# Altium PCB SBH_Charger.PcbDoc (part 2 of 3)
Units mil, origin at the board's own origin, x right, y up, seen from the top; angles counter-clockwise.
Board outline 4700 x 3200 mil, 4 copper layers (Top Layer, Mid Layer 1, Mid Layer 2, Bottom Layer), stack 61.811 mil thick; 160 components, 116 nets, 654 pads, 375 vias.
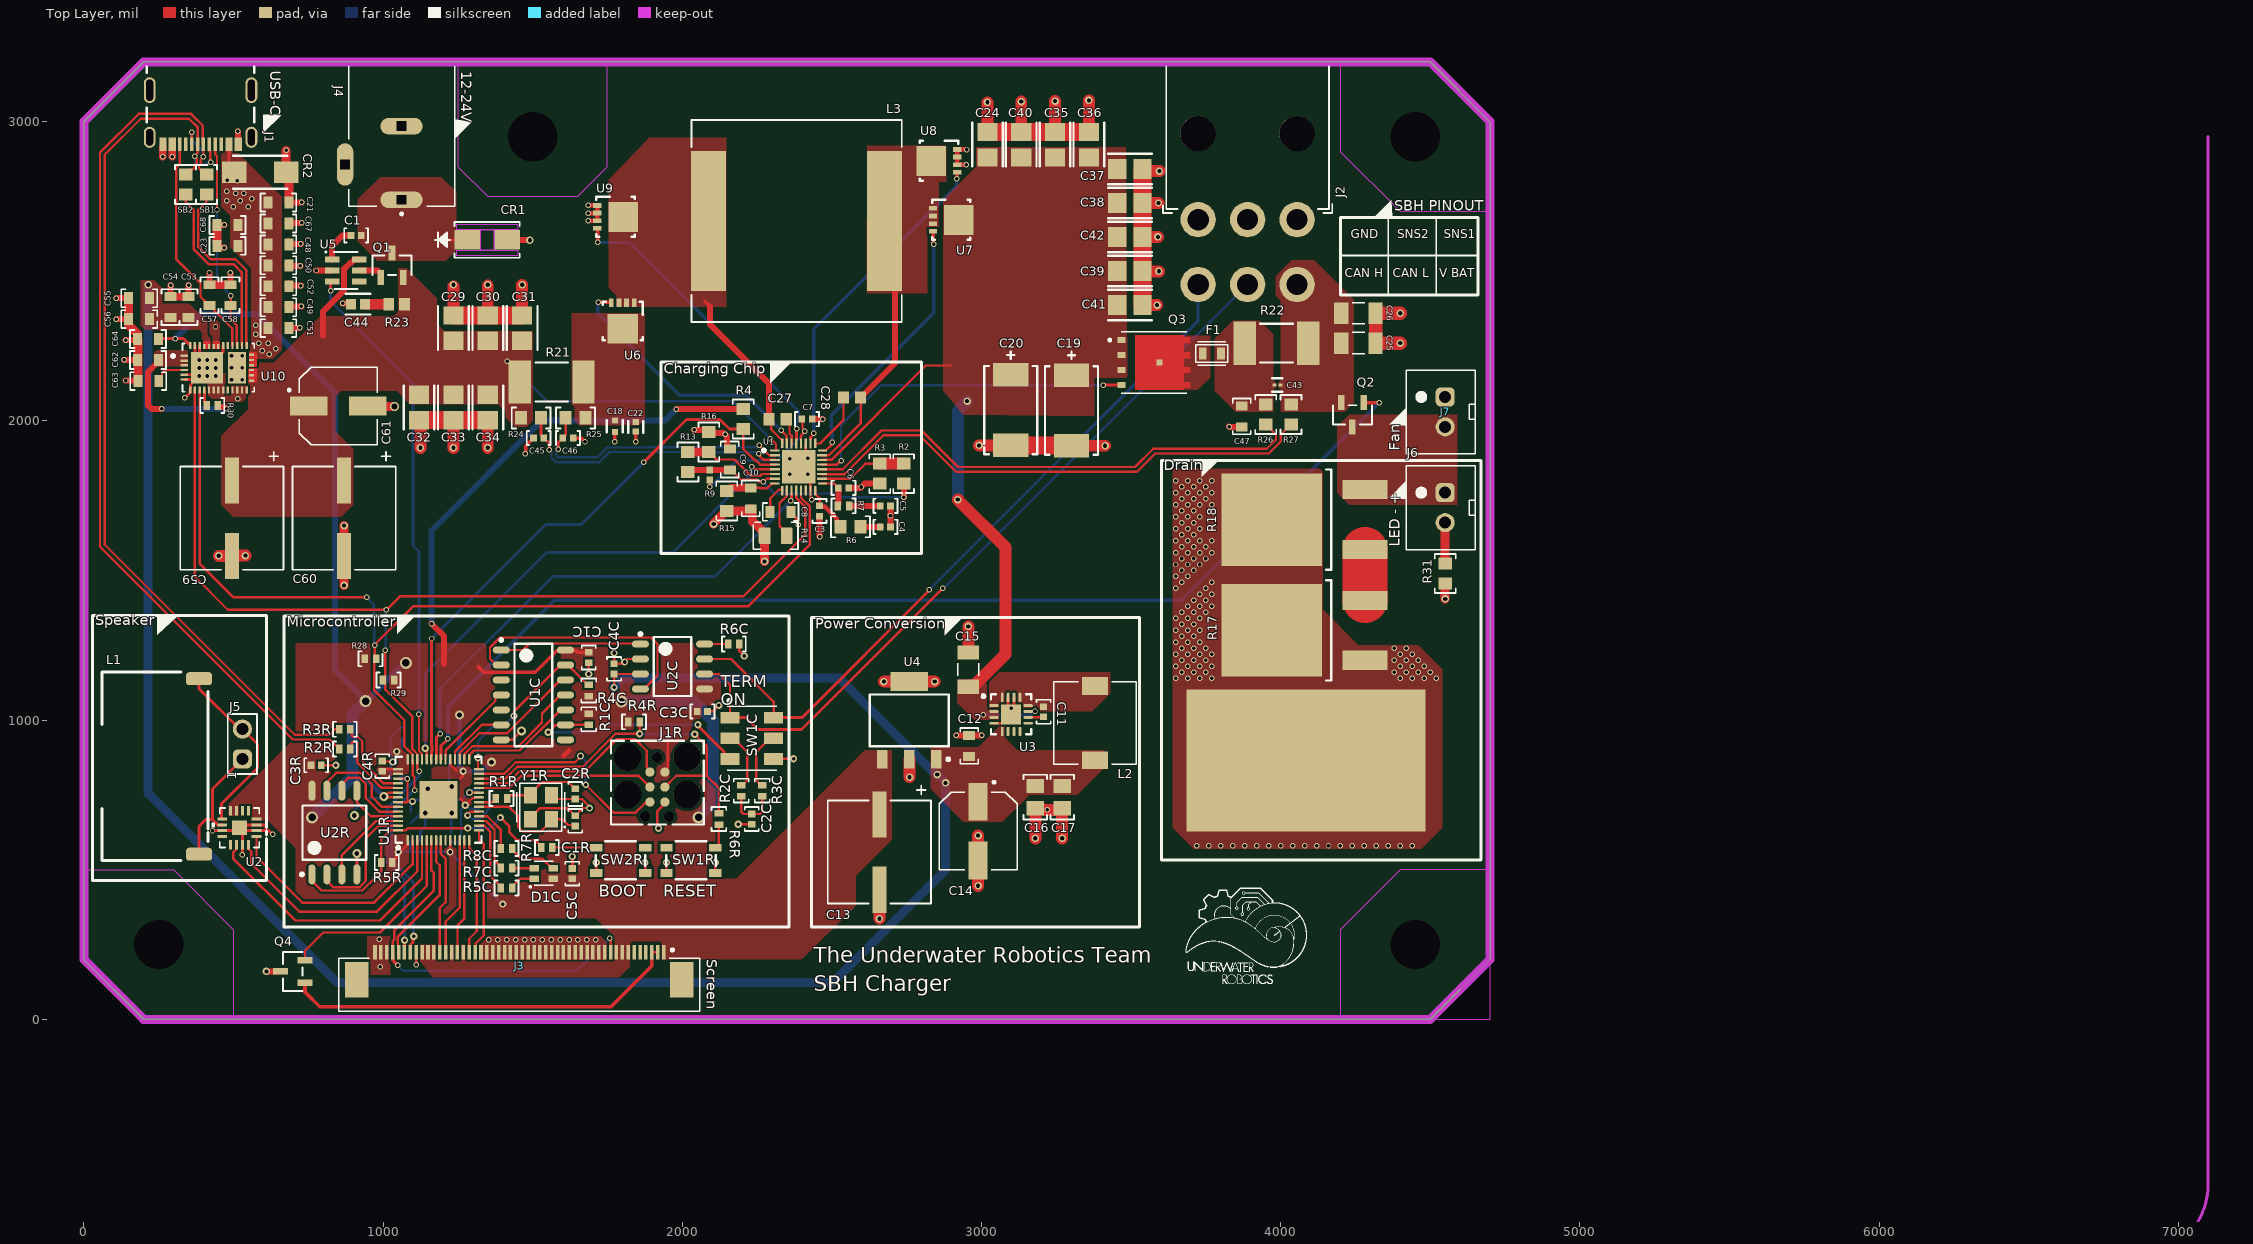
[diagram p0: Top Layer view]

## Part data (continued)
R3: library part RESISTOR_100K_0603, "RES 100k OHM 5% 1/10W 0603", Digikey Part Numer=CR0603-JW-104ELFTR-ND, Supplier Part Number 1=CR0603-JW-104ELFCT-ND, Tolerance="+/- 5%", Value  (Ohms)=100K, ComponentLink1Description=Datasheet, ComponentLink1URL=https://www.bourns.com/docs/product-datasheets/CRxxxxx.pdf, Made By="Flip B", Supplier=Digikey, Supplier 1=Digi-Key, Wattage=1/10W
R4: library part RESISTOR_10K_0603, "RES 10k OHM 5% 1/10W 0603", Digikey Part Numer=CR0603-JW-104ELFTR-ND, Supplier Part Number 1=2019-RK73B1JTTD103JCT-ND, Tolerance="+/- 5%", Value  (Ohms)=10K, ComponentLink1Description=Datasheet, ComponentLink1URL=https://www.bourns.com/docs/product-datasheets/CRxxxxx.pdf, Made By="Robert Pafford", Supplier=Digikey, Supplier 1=Digi-Key, Wattage=1/8W
R5C: library part RESISTOR_604_0402, "RES 604 OHM 1% 1/16W 0402", Digikey Part Numer=CR0603-JW-104ELFTR-ND, Supplier Part Number 1=13-AC0402FR-07604RLCT-ND, Tolerance="+/- 1%", Value  (Ohms)=604, Made By="Robert Pafford", Supplier=Digikey, Supplier 1=Digi-Key, Wattage=1/16W
R6: library part RESISTOR_15K_0603, "RES 15k OHM 5% 1/10W 0603", Digikey Part Numer=CR0603-JW-104ELFTR-ND, Supplier Part Number 1=RMCF0603JG15K0, Tolerance="+/- 5%", Value  (Ohms)=15K, ComponentLink1Description=Datasheet, ComponentLink1URL=https://www.bourns.com/docs/product-datasheets/CRxxxxx.pdf, Made By="Dylan Trainor", Supplier=Digikey, Supplier 1=Avnet, Wattage=1/8W
R7: library part RESISTOR_16.9K_0402, "16.9 kOhms ±1% 0.063W, 1/16W Chip Resistor 0402 (1005 Metric) Moisture Resistant Thick Film", Supplier Part Number 1=5791231, Tolerance="+/- 1%", Value  (Ohms)=16.9k, Made By="Andrew Lin", Supplier 1="Future Electronics", Wattage=1/16W
R7C R8C: library part RESISTOR_200_0402, "RES 200 OHM 1% 1/16W 0402", Digikey Part Numer=CR0603-JW-104ELFTR-ND, Supplier Part Number 1=YAG3453CT-ND, Tolerance="+/- 1%", Value  (Ohms)=200, Made By="Robert Pafford", Supplier=Digikey, Supplier 1=Digi-Key, Wattage=1/16W
R9: library part CMP-2002-03046-1, Manufacturer="Vishay Dale", Part Number=CRCW040210R0FKEDHP
R13: library part RESISTOR_470K_0603, "RES 470k OHM 5% 1/10W 0603", Supplier Part Number 1=RMCF0603JT470KCT-ND, Tolerance="+/- 5%", Value  (Ohms)=470K, ComponentLink1Description=Datasheet, ComponentLink1URL=https://www.bourns.com/docs/product-datasheets/CRxxxxx.pdf, Made By="Robert P", Supplier 1=Digi-Key, Wattage=1/10W
R14: library part RESISTOR_33K_0805, "RES 33k OHM 5% 1/8W 0805", Digikey Part Numer=CR0603-JW-104ELFTR-ND, Supplier Part Number 1=65T8819, Tolerance="+/- 5%", Value  (Ohms)=33K, ComponentLink1Description=Datasheet, ComponentLink1URL=https://www.bourns.com/docs/product-datasheets/CRxxxxx.pdf, Made By="Dylan Trainor", Supplier=Digikey, Supplier 1=Newark, Wattage=1/8W
R15: library part RESISTOR_169K_1%_0603, "169 kOhms ±1% 0.333W, 1/3W Chip Resistor 0603 (1608 Metric) Automotive AEC-Q200, Pulse Withstanding Thick Film", Digikey Part Numer=CR0603-JW-104ELFTR-ND, Supplier Part Number 1=CRCW0603169KFKEAHP-ND, Tolerance="+/- 1%", Value  (Ohms)=169K, ComponentLink1Description=Datasheet, ComponentLink1URL=https://www.bourns.com/docs/product-datasheets/CRxxxxx.pdf, Made By="Andrew Lin", Supplier=Digikey, Supplier 1=Digi-Key, Wattage=1/10W
R16: library part RESISTOR_270K_1%_0603, "RES 270k OHM 1% 1/10W 0603", Digikey Part Numer=CR0603-JW-104ELFTR-ND, Supplier Part Number 1=71-CRCW0603-270K-E3, Tolerance="+/- 1%", Value  (Ohms)=270K, ComponentLink1Description=Datasheet, ComponentLink1URL=https://www.bourns.com/docs/product-datasheets/CRxxxxx.pdf, Made By="Andrew Lin", Supplier=Digikey, Supplier 1=Mouser, Wattage=1/10W
R17 R18: "RES SMD 10 OHM 5% 25W DPAK", Mfr_Name="Bourns Electronics", Supplier Part Number 1=118-PWR163S-25-10R0JECT-ND, Copyright="Copyright (C) 2023 Ultra Librarian. All rights reserved.", Manufacturer_Part_Number=PWR163S-25-10R0JE, Supplier 1=Digi-Key
R21 R22: library part CMP-33361-000001-1, "2W 0.010 OHMS 0.5% 2512", Manufacturer=Ohmite, Package=PCS2512, Power Rating=2W, Resistance=10mΩ, Temperature="-55°C to +170°C", Temperature Coefficient=50ppm/°C, Temperature Range High=+170°C, Temperature Range Low=-55°C, Tolerance=0.%, Automotive=Yes, Automotive Grade="Grade 0", Category=Res, ComponentLink2Description=Datasheet, ComponentLink2URL=https://www.ohmite.com/assets/docs/res_pcs.pdf?r=false, Composition="Metal Film", Device Class L1="Passive Components", Device Class L2=Resistors, Device Class L3="Chip SMD Resistors", Digikey Description="2W 0.010 OHMS 0.5% 2512", Height=0.664mm, Ipc Land Pattern Name=RESC635305X41, Lead Free=Yes, Manufacturer Part Number=PCS2512DR0100ET, Octopart=https://octopart.com/pcs2512dr0100et-ohmite-106082038, RoHS=TRUE, Series=PCS
R23: library part CMP-2000-03206-1, Manufacturer="Vishay Dale", Part Number=CRCW06032R20FKEA
R24 R25: library part RESISTOR_4.7_0603, "RES 4.7 OHM 5% 1/8W 0603", Digikey Part Numer=CR0603-JW-104ELFTR-ND, Supplier Part Number 1=2019-RK73B1JTTD4R7JCT-ND, Tolerance="+/- 5%", Value  (Ohms)=4.7, Made By="Robert Pafford", Supplier=Digikey, Supplier 1=Digi-Key, Wattage=1/8W
R26 R27: library part RESISTOR_27_0603, "RES 27 OHM 5% 1/8W 0603", Digikey Part Numer=CR0603-JW-104ELFTR-ND, Supplier Part Number 1=2019-RK73B1JTTD270JCT-ND, Tolerance="+/- 5%", Value  (Ohms)=27, ComponentLink1Description=Datasheet, ComponentLink1URL=https://www.bourns.com/docs/product-datasheets/CRxxxxx.pdf, Made By="Robert Pafford", Supplier=Digikey, Supplier 1=Digi-Key, Wattage=1/8W
R28 R29: library part RESISTOR_2.2K_0402_1, "RES 2.2K OHM 1% 1/16W 0402", Supplier Part Number 1=9737263, Tolerance="+/- 1%", Value  (Ohms)=2.2K, Made By="Megan McCabe", Supplier 1="Future Electronics", Wattage=1/16W
R31: library part RESISTOR_2.1K_0603, "RES 2.1k OHM 5% 1/8W 0603", Digikey Part Numer=CR0603-JW-104ELFTR-ND, Supplier Part Number 1=YAG1852CT-ND, Tolerance="+/- 5%", Value  (Ohms)=2.1K, ComponentLink1Description=Datasheet, ComponentLink1URL=https://www.bourns.com/docs/product-datasheets/CRxxxxx.pdf, Made By="Robert Pafford", Supplier=Digikey, Supplier 1=Digi-Key, Wattage=1/8W
SB1 SB2: library part JUMPER_0_0603, "0 Ohm Jumper No Fit for Solder Bridge", Value  (Ohms)=0, ComponentLink1Description=Digikey, ComponentLink1URL=https://www.digikey.com/en/products/detail/koa-speer-electronics-inc/RK73B1JTTD101J/9844701, Made By="Robert Pafford"
SW1C: library part CAS-220TA_CAN_TERM, "GOLD SWITCH FLUSH SLIDE DPDT 100MA 6V", Current Rating="100 mA", Supplier Part Number 1=CAS220JCT-ND, Voltage Rating=6VDC, Contact Finish=Gold, Made By="Robert Pafford", Supplier 1=Digi-Key, Switch Function=DPDT
SW1R SW2R: library part "Tactile Switch SMD", "WS-TASV J-Bend SMT Tact Switch, SPST-NO, 16VDC, 50mA, 260g", Manufacturer="Wurth Elektronik", Operating Temperature Max=85°C, Operating Temperature Min=-40°C, Rated Current=50mA, Rated Voltage=16VDC, Category="Tact Switches", Circuit=SPST-NO, ComponentLink1Description="Website Link", ComponentLink1URL=https://www.we-online.com/redexpert/article/434123025826?ad, ComponentLink2Description="Datasheet Link", ComponentLink2URL=https://www.we-online.com/redexpert/spec/434123025826?ad, Contact Material="Stainless Steel", Contact Plating=Silver, Height=2.5mm, Length=4.2mm, Manufacturer Part Number=434123025826, Match Code=WS-TASV, Mount="Surface Mount", Operation Force=260g, Packaging="Tape and Reel", Terminal Material="Copper Alloy", Terminal Plating=Silver, Washable=No, Width=3.2mm
U1: "I2C 1 TO 5 CELL, 2-V, NARROW VDC, Charger IC Multi-Chemistry 32-QFN (4x4)", Mfr_Name="Texas Instruments", Supplier Part Number 1=595-BQ25730RSNR, Copyright="Copyright (C) 2024 Ultra Librarian. All rights reserved.", Manufacturer_Part_Number=BQ25730RSNR, RefDes=RefDes, Supplier 1=Mouser, Type=DEV
U1C: "CANbus Controller CAN 2.0 SPI Interface 14-SOIC", Made By="Robert Pafford", Max FD Rate="8 Mbps"
U1R: "Raspberry Pi RP2040", Crystal Frequency="12 MHz", Input Voltage=3.3V, Available Busses="SPI, I2C, PWM, USB", ComponentLink1Description=DigiKey, ComponentLink2Description=Datasheet, ComponentLink2URL=https://datasheets.raspberrypi.org/rp2040/rp2040-datasheet.pdf, Made By="Robert Pafford", Number of GPIOs=29
U2: "Audio Amplifiers Digital Input Class D Amplifier", Mfr_Name="Analog Devices Inc", Made By="Andrew Lin", RefDes=RefDes, Supplier 1="Arrow Electronics", Supplier Part Number 1=MAX98357AETE+T
U2C: library part TJA1442AT, "CAN Interface IC High-Speed CAN Transceiver with Standby Mode", Supplier Part Number 1=771-TJA1442AT/0Z, Made By="Robert Pafford", Max Data Rate=5Mbps, Supplier 1=Mouser
U2R: "IC FLASH 128MBIT SPI/QUAD 8SOIC", Supplier Part Number 1=W25Q128JVSIQ-ND, Made By="Robert Pafford", Size=128M, Supplier 1=Digi-Key
U3: library part TS30041-M050QFNR, "Buck Switching Regulator IC Positive Fixed 5V 1 Output 1A 16-VFQFN Exposed Pad", Max Current=1A, Max Input Voltage=40V, Output Voltage="5V (Fixed)", Supplier Part Number 1=TS30041-M050QFNRCT-ND, Made By="Robert Pafford", Supplier 1=Digi-Key
U4: library part CMP-1109-00085-1, "Low Drop Linear Voltage Regulator, 4.7 to 40 V Supply, 3.3 V Output, -40 to 150 degC, PG-SOT223 (SC-73), Reel, Green", Dropout Voltage="250 mV", Manufacturer=Infineon, Max. Output Current="400 mA", Operating Range="4.7 to 40 V", Output Voltage="3.3 V", Typical Quiescent Current="100 uA", Accuracy="2 %", ComponentLink1Description="Manufacturer URL", ComponentLink1URL=http://www.infineon.com/, ComponentLink2Description=Datasheet, ComponentLink2URL=http://www.infineon.com/dgdl/TLE42744_DS_11.pdf?folderId=db3a304318f3fe290118f5a433570040&fileId=db3a304327b897500128012ccafe37d2&location=en.Products.Automotive_ICs.Linear_Voltage_Regulators_for_Automotive-Applications.Linear_Voltage_Regulators_-_Selectio, ComponentLink3Description="Package Specification", ComponentLink3URL=http://www.infineon.com/dgdl/SOT223-Package_Overview.pdf?folderId=db3a30431936bc4b0119530470b03c3d&fileId=db3a30431936bc4b0119531d40b93c5c, DatasheetVersion="Rev. 1.1", Green=TRUE, Mounting Technology="Surface Mount", PackageDescription="4-Pin Small Outline Transistor Package, 6.5 x 3.5 mm Body, 2.3 mm Pitch", PackageReference="PG-SOT223 (SC-73)", PackageVersion=Apr-08, Packing=Reel, PartNumber="TLE42744GS V33", Regulator Type="single output"
U5: "OR Controller Source Selector Switch P-Channel 2:1 TSOT-23-6", Package="SOT-23-6 Analog Devices", Arrow_Europe-Purchase-URL=https://snapeda.com/shop?store=Arrow+Europe&id=4343773, Availability=Good, Check_prices=https://www.snapeda.com/parts/LTC4412ES6%23TRPBF/Analog%20Devices/view-part/4343773/?ref=eda, DigiKey-Purchase-URL=https://snapeda.com/shop?store=DigiKey&id=4343773, MF="Analog Devices", Mouser-Purchase-URL=https://snapeda.com/shop?store=Mouser&id=4343773, MP=LTC4412ES6#TRPBF, Price=None, SnapEDA_Link=https://www.snapeda.com/parts/LTC4412ES6%23TRPBF/Analog%20Devices/view-part/4343773/?ref=snap
U6 U7 U8 U9: "N-Channel 30 V 30A 24W Surface Mount 8-DFN (3.15x3.05)", Mfr_Name="Goford Semiconductor", Supplier Part Number 1=3141-G30N03D3CT-ND, VALUE_2=Value, Copyright="Copyright (C) 2023 Ultra Librarian. All rights reserved.", Manufacturer_Part_Number=G30N03D3, RefDes=RefDes, Supplier 1=Digi-Key, Type=DEV
U10: "USB, Type-C Controller PMIC 38-WQFN (4x6)", Mfr_Name="Texas Instruments", Copyright="Copyright (C) 2023 Ultra Librarian. All rights reserved.", Made By="Andrew Lin", Manufacturer_Part_Number=TPS25750DRJKR, RefDes=RefDes, Type=DEV
Y1R: library part CRYSTAL_12MHz_SMD_SMALL, "12 MHz ±20ppm Crystal 18pF 100 Ohms 4-SMD, No Lead (3.2x2.5mm)", Frequency="12 MHz", Load Capacitance=18pF, Supplier Part Number 1=2151-RH100-12.000-18-2030-EXT-TRCT-ND, ESR="100 Ohms", Made By="Robert Pafford", Supplier 1=Digi-Key

## Free pads (board coordinates)
  round 60 hole 165: 1(250,250) 1(1500,2950) 1(4450,250) 212(4450,2950)
  rect 800x475 smd: 213(4085,865)

## Via types
v1: diameter 18.3, hole 11.81, Top Layer to Bottom Layer, tented both sides, 277 vias
v2: diameter 25, hole 14, Top Layer to Bottom Layer, tented both sides, 42 vias
v3: diameter 24, hole 12, Top Layer to Bottom Layer, tented both sides, 37 vias
v4: diameter 30, hole 16, Top Layer to Bottom Layer, tented both sides, 10 vias
v5: diameter 40, hole 25, Top Layer to Bottom Layer, tented both sides, 5 vias
v6: diameter 22.3, hole 12, Top Layer to Bottom Layer, tented both sides, 2 vias
v7: diameter 18, hole 11.81, Top Layer to Bottom Layer, tented both sides, 1 vias
v8: diameter 30, hole 20, Top Layer to Bottom Layer, tented both sides, 1 vias

## Nets (pads, with @x,y where several pads share a name; then routed paths per layer and width w, separated by ;. In a path a pad name is that pad's centre, name@x,y a point inside that pad or via, vN(x,y) a via of type N, cw(c..) or ccw(c..) an arc to the next point about the centre after c; other vN are vias at no path point)
1v1_RP2040: C11R.1 C12R.1 C13R.1 U1R.23 U1R.45 U1R.50 | length 483.3
  Top Layer w8: U1R.50@1049.95,725.75 1081.67,725.75 ; U1R.45@1049.95,804.49 1050.01,804.43 v7@1081.18,804.43 ; v7@1081.67,804.43 1081.67,725.75 ; v3(1098.38,728.15) 1097.99,727.75 1083.67,727.75 1081.67,725.75 ; v3(1288.8,758.03) 1289.53,757.31 1320.55,757.31 U1R.23@1320.61,757.24
  Bottom Layer w8: C13R.1@1092.41,694.12 1092.63,694.34 v3@1092.63,728.15 ; v3(1098.38,728.15) 1102.71,728.15 1108.69,734.12 1264.89,734.12 v3(1288.8,758.03) ; v3@1290,759 1291.95,759 1300.88,767.93 C12R.1@1319.35,767.93
  Bottom Layer w20: C11R.1@1059.53,804.12 1059.62,804.21 1081.21,804.21 v7(1081.3,804.31)

## Text inside footprints (layer, text, board x,y; h text height)
J5: Top Overlay "1" at 510,800 h30 r90
U2: Top 3D Body "*" at 573.5,625.63 h50 r180